# Altium PCB NB3000XN.PcbDoc (part 30 of 71)
Units mil, origin at the board's own origin, x right, y up, seen from the top; angles counter-clockwise.
Board outline 9527.56 x 6929.77 mil, 6 copper layers (Top Layer, GND+SHIELD, MidLayer1, MidLayer2, P2 - 3V3+5V0, Bottom Layer), stack 62.375 mil thick; 832 components, 1027 nets, 4655 pads, 4981 vias.
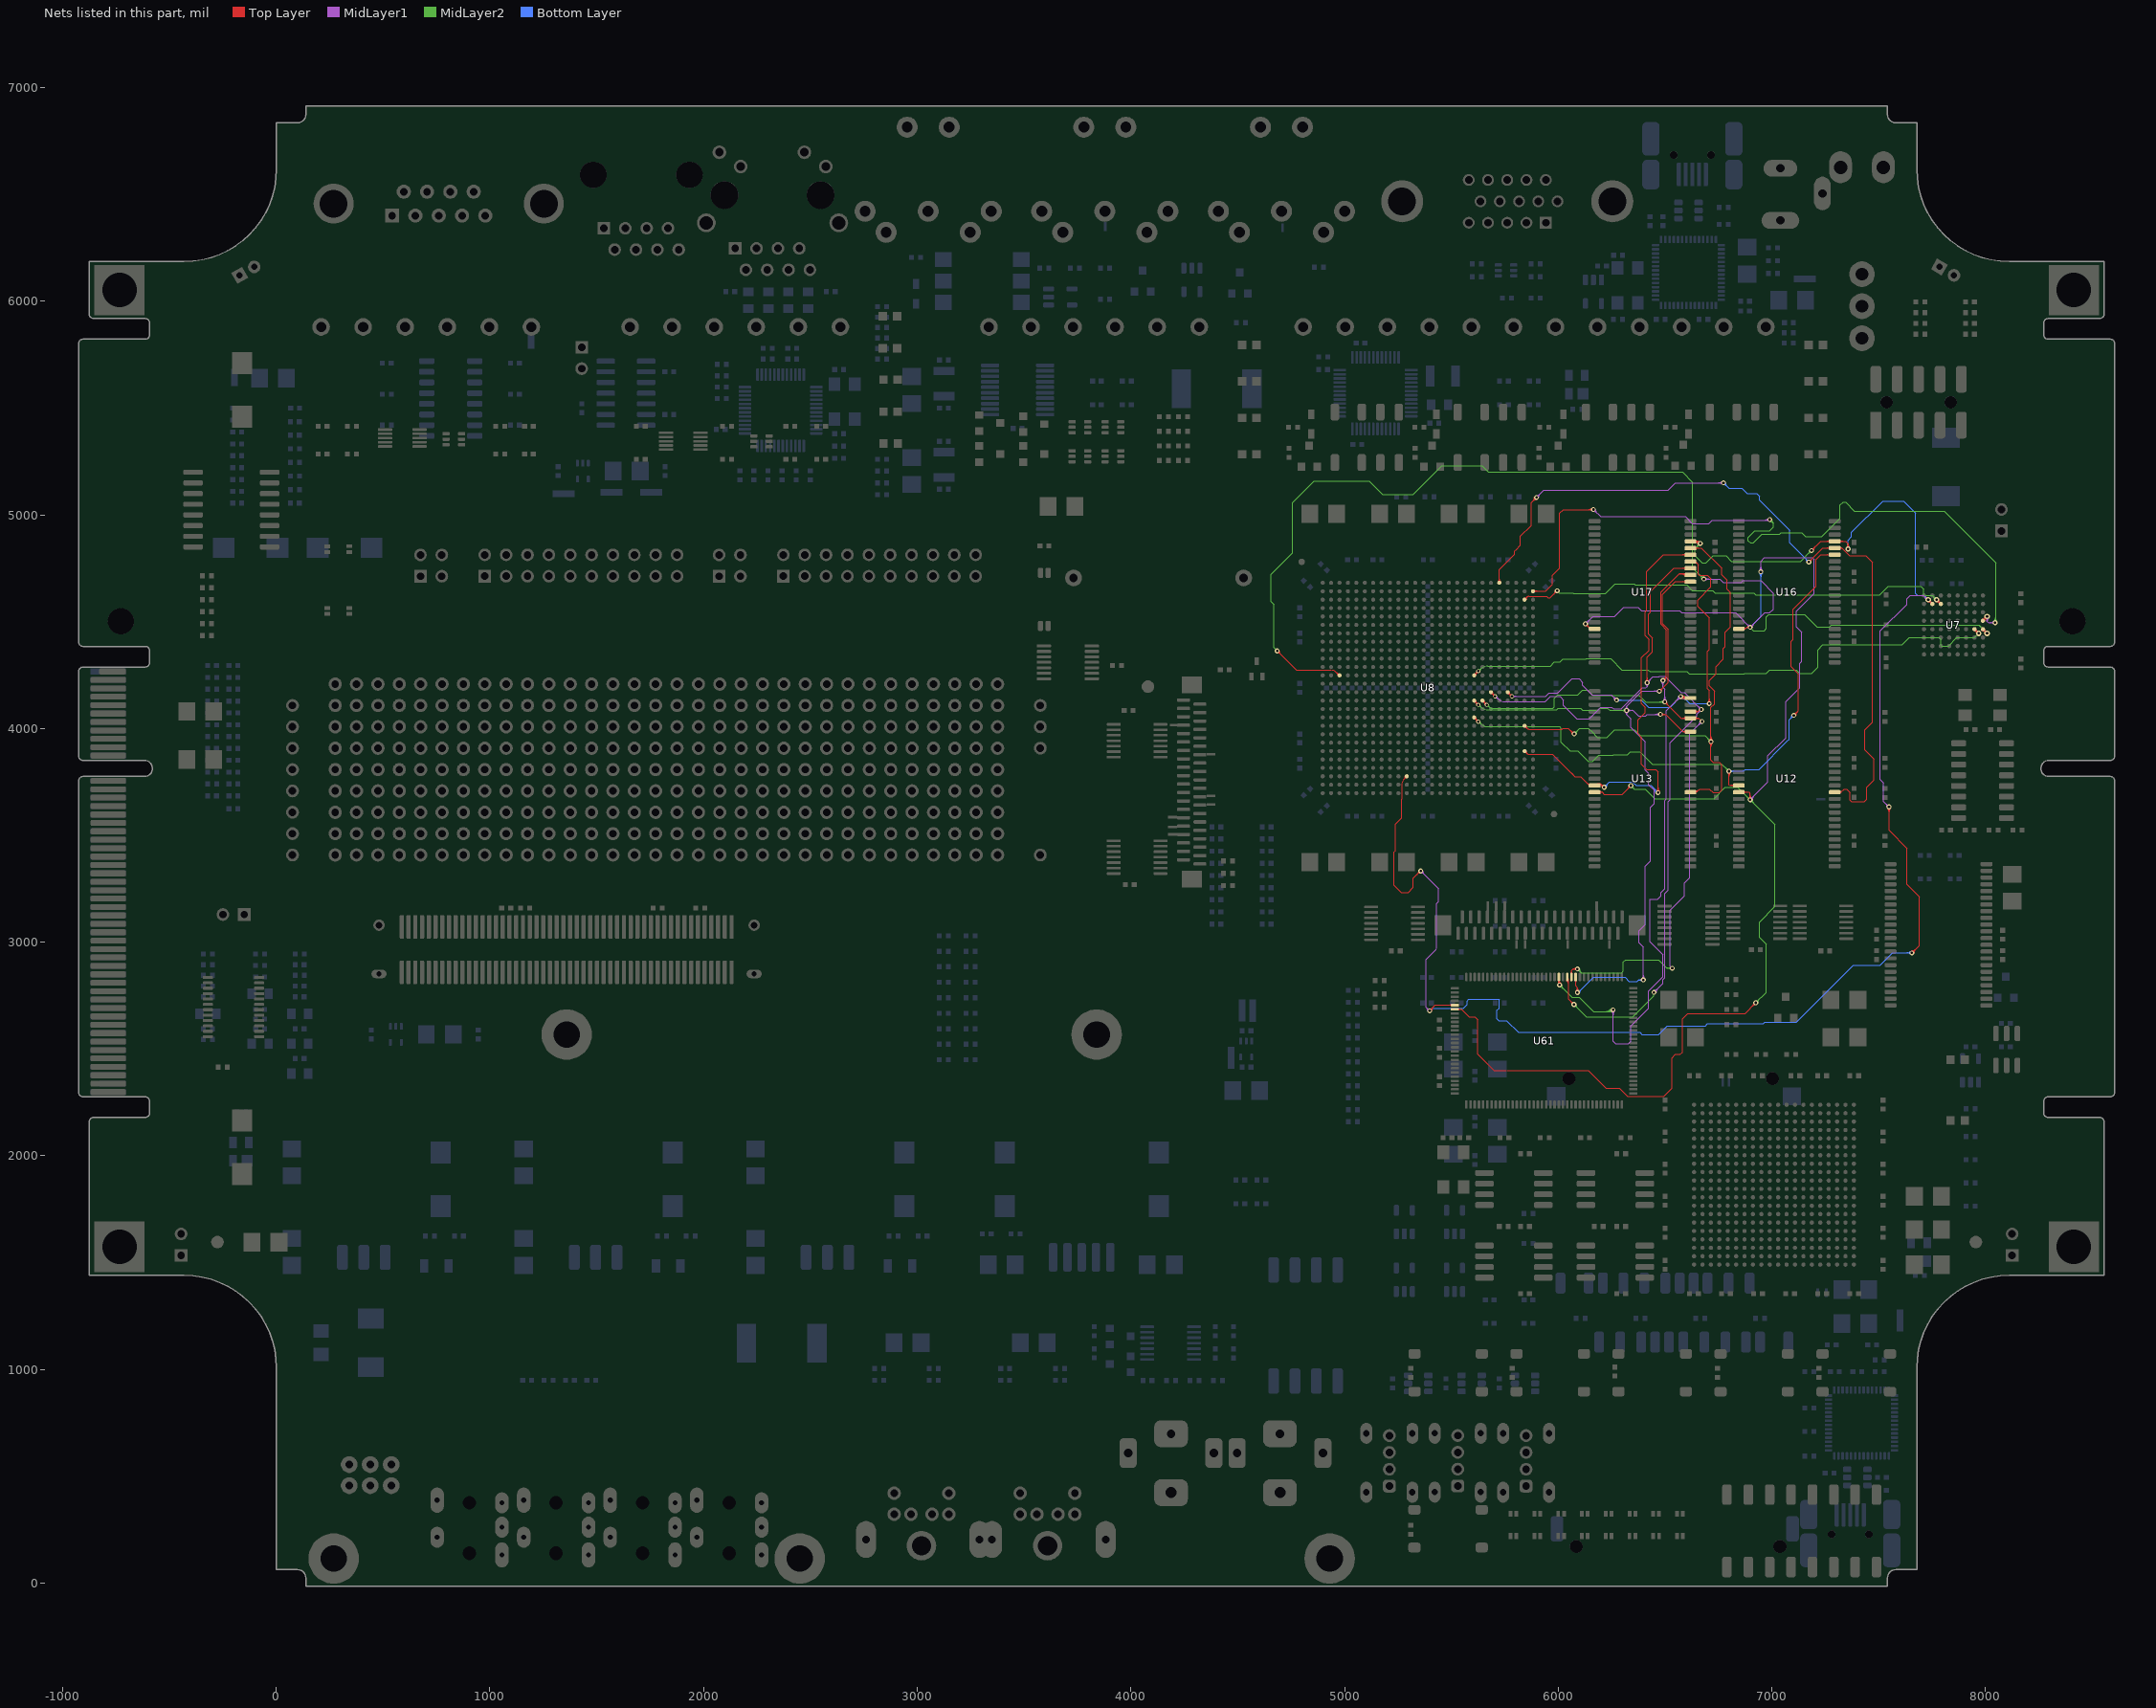
[diagram p34: the nets of this part, all layers, seen from the top]

## Via types
v1: diameter 23, hole 11.81, Top Layer to Bottom Layer, 3672 vias
v2: diameter 26, hole 11.81, Top Layer to Bottom Layer, 461 vias
v3: diameter 19, hole 11.81, Top Layer to Bottom Layer, tented both sides, 396 vias
v4: diameter 23.62, hole 11.81, Top Layer to Bottom Layer, 288 vias
v5: diameter 20, hole 11.81, Top Layer to Bottom Layer, 91 vias
v6: diameter 23, hole 11.81, Top Layer to Bottom Layer, tented both sides, 50 vias
v7: diameter 31, hole 11.81, Top Layer to Bottom Layer, 15 vias
v8: diameter 27.56, hole 11.81, Top Layer to Bottom Layer, tented both sides, 4 vias
v9: diameter 29, hole 11.81, Top Layer to Bottom Layer, 3 vias
v10: diameter 21, hole 11.81, Top Layer to Bottom Layer, 1 vias

## Nets (pads, with @x,y where several pads share a name; then routed paths per layer and width w, separated by ;. In a path a pad name is that pad's centre, name@x,y a point inside that pad or via, vN(x,y) a via of type N, cw(c..) or ccw(c..) an arc to the next point about the centre after c; other vN are vias at no path point) (continued)
DB_MEM.BUS_D28: U8.R19 U13.48 U17.35 U61.76 | length 4548
  Top Layer w4: U8.R19@5606.54,4123.44 cw(c5606.54,4105.34) 5619.34,4118.14 cw(c5632.14,4130.94) U8.R19@5614.04,4130.94 ; U8.R19@5606.54,4123.6 cw(c5606.54,4105.88) 5619.07,4118.41 cw(c5631.6,4130.94) U8.R19@5613.88,4130.94 ; U8.R19@5606.54,4130.94 v3(5626.22,4111.26) ; U61.76@6078.98,2821.32 cw(c6072.15,2814.49) 6081.81,2814.49 cw(c6091.47,2814.49) U61.76@6084.64,2821.32 ; U61.76@6081.81,2837.34 6081.81,2795 6090.19,2786.62 ; v1@6083.7,2771.64 ccw(c6069.67,2786.62) 6090.19,2786.62 ; v1@6086.43,2768.72 ccw(c6078.31,2777.39) 6090.19,2777.39 ccw(c6102.07,2777.39) v1@6093.95,2768.72 ; v1(6090.19,2764.71) 6090.19,2786.62 ; v1@6096.68,2771.64 cw(c6110.71,2786.62) 6090.19,2786.62 ; v1(6473.52,4175.04) 6515.19,4216.71 6515.19,4465.37 6488.86,4491.71 6488.86,4627.58 6548.52,4687.24 U17.35@6619.41,4687.24 ; v1@6473.52,4180.54 ccw(c6473.52,4193.82) 6482.91,4184.43 ccw(c6492.3,4175.04) v1@6479.02,4175.04 ; v1@6473.52,4184.54 ccw(c6473.52,4207.48) 6489.74,4191.26 ccw(c6505.96,4175.04) v1@6483.02,4175.04 ; v1(6478.52,4066.71) 6503.29,4066.71 6584.53,3985.47 ; v1@6482.41,4062.82 cw(c6491.8,4053.43) 6491.8,4066.71 cw(c6491.8,4079.99) v1@6482.41,4070.6 ; v1@6485.24,4059.99 cw(c6501.46,4043.77) 6501.46,4066.71 cw(c6501.46,4089.64) v1@6485.24,4073.43 ; U13.48@6595.76,3980.29 ccw(c6584.53,3970.72) 6584.53,3985.47 ; U13.48@6595.76,3990.66 cw(c6584.53,4000.23) 6584.53,3985.47 ; U17.35@6596.19,4681.59 ccw(c6582.54,4667.93) 6582.54,4687.24 ccw(c6582.54,4706.56) U17.35@6596.19,4692.9 ; U13.48@6619.41,3985.47 6584.53,3985.47 ; 5613.42,4124.06 cw(c5600.61,4111.26) 5618.72,4111.26 ccw(c5600.61,4111.26) 5613.42,4124.06 ; 5613.42,4124.06 ccw(c5626.22,4136.87) 5626.22,4118.76 cw(c5626.22,4136.87) 5613.42,4124.06
  MidLayer1 w4: v4@6314,4077.24 cw(c6304.52,4065) 6320,4065 ; v4@6314.24,4092.94 ccw(c6306.04,4104.24) 6320,4104.24 ; v4@6316.44,4080.4 cw(c6310.83,4073.15) 6320,4073.15 cw(c6329.17,4073.15) v4@6323.56,4080.4 ; v4@6324.11,4080.89 cw(c6334.03,4070.97) 6334.03,4085 cw(c6334.03,4099.03) v4@6324.11,4089.11 ; v4@6325.76,4092.94 cw(c6333.96,4104.24) 6320,4104.24 ; v4@6326,4077.24 ccw(c6335.48,4065) 6320,4065 ; v4@6326.94,4078.06 cw(c6343.69,4061.31) 6343.69,4085 cw(c6343.69,4108.69) v4@6326.94,4091.94 ; v1@6391.81,2830.09 ccw(c6375.59,2846.31) 6398.52,2846.31 ccw(c6421.46,2846.31) v1@6405.24,2830.09 ; v1@6394.64,2827.26 ccw(c6385.25,2836.65) 6398.52,2836.65 ccw(c6411.8,2836.65) v1@6402.41,2827.26 ; v1(6398.52,2823.37) 6398.52,2978.02 6379.19,2997.35 6379.19,3054.08 6406.86,3081.75 6406.86,3356.39 6431.86,3381.39 6431.86,3631.06 6449.19,3648.39 6449.19,3711.35 6423.52,3737.02 6423.52,3789.35 6406.86,3806.02 6406.86,3937.69 6340,4004.54 6340,4045 6320,4065 ; v1@6466.81,4168.32 ccw(c6450.59,4152.11) 6450.59,4175.04 ccw(c6450.59,4197.98) v1@6466.81,4181.76 ; v1@6469.64,4171.15 ccw(c6460.25,4161.76) 6460.25,4175.04 ccw(c6460.25,4188.32) v1@6469.64,4178.93 ; v1@6471.81,4059.99 ccw(c6455.59,4043.77) 6455.59,4066.71 ccw(c6455.59,4089.64) v1@6471.81,4073.43 ; v1(6473.52,4175.04) 6390.8,4175.04 6320,4104.24 ; v1@6474.64,4062.82 ccw(c6465.25,4053.43) 6465.25,4066.71 ccw(c6465.25,4079.99) v1@6474.64,4070.6 ; v1(6478.52,4066.71) 6416.71,4066.71 6410,4060 6375,4060 6350,4085 v4(6320,4085) ; 6320,4065 v4(6320,4085) ; v4(6320,4085) 6320,4104.24
  MidLayer2 w4: v3@5626.87,4103.79 cw(c5628.45,4085.75) 5640.09,4099.62 ; v3@5633.69,4111.91 ccw(c5651.73,4113.49) 5640.09,4099.62 ; v4@6313.06,4078.06 ccw(c6296.31,4061.31) 6296.31,4085 ccw(c6296.31,4108.69) v4@6313.06,4091.94 ; v4@6315.89,4080.89 ccw(c6305.97,4070.97) 6305.97,4085 ccw(c6305.97,4099.03) v4@6315.89,4089.11 ; v4(6320,4085) 6242.25,4085 6231.54,4095.71 6195.71,4095.71 6185,4085 6115,4085 6105,4095 6000,4095 5992.4,4087.4 5920,4087.4 5910,4087.4 5782.64,4087.4 5763.22,4087.4 5689.1,4087.4 5669.6,4087.4 cw(c5669.6,4129.13) 5640.09,4099.62
  Bottom Layer w4: v1(6090.19,2764.71) 6094.86,2764.71 6166.19,2836.04 6312.52,2836.04 6331.86,2816.71 6370,2816.71 6376.67,2823.37 ; v1@6090.19,2766.21 ccw(c6090.19,2781.1) 6100.72,2770.57 ; v1@6090.19,2770.21 ccw(c6090.19,2794.75) 6107.55,2777.4 ; v1@6090.19,2774.21 ccw(c6090.19,2808.41) 6114.37,2784.23 ; v1@6099.69,2764.71 cw(c6111.36,2764.71) 6103.11,2772.96 ; v1@6391.58,2816.89 ccw(c6376.67,2802.98) 6376.67,2823.37 ; v1@6391.58,2829.86 cw(c6376.67,2843.77) 6376.67,2823.37 ; v1@6394.5,2819.62 ccw(c6385.87,2811.57) 6385.87,2823.37 ccw(c6385.87,2835.18) v1@6394.5,2827.13 ; v1(6398.52,2823.37) 6376.67,2823.37
DB_MEM.BUS_D29: U8.R20 U13.50 U17.36 U61.77 | length 4450
  Top Layer w4: U8.R20@5645.91,4123.44 cw(c5645.91,4105.34) 5658.71,4118.14 cw(c5671.51,4130.94) U8.R20@5653.41,4130.94 ; U8.R20@5645.91,4123.6 cw(c5645.91,4105.88) 5658.44,4118.41 cw(c5670.97,4130.94) U8.R20@5653.25,4130.94 ; U8.R20@5645.91,4130.94 v3(5665.59,4111.26) ; U61.77@6059.3,2853.36 ccw(c6052.47,2860.19) 6062.13,2860.19 ccw(c6071.78,2860.19) U61.77@6064.95,2853.36 ; U61.77@6062.12,2837.34 6062.13,2867.04 6070.13,2875.04 ; v1@6082.84,2869.02 ccw(c6070.13,2858.6) 6070.13,2875.04 ; v1@6082.84,2881.06 cw(c6070.13,2891.48) 6070.13,2875.04 ; v1@6085.94,2871.56 ccw(c6078.57,2865.52) 6078.57,2875.04 ccw(c6078.57,2884.56) v1@6085.94,2878.53 ; v1(6090.19,2875.04) 6070.13,2875.04 ; v1(6490.19,4225.04) 6506.86,4241.71 6506.86,4462.39 6480.52,4488.73 6480.52,4639.37 6566.19,4725.04 6601.84,4725.04 6601.84,4718.74 U17.36@6619.41,4718.74 ; v1@6490.19,4230.54 ccw(c6490.19,4243.82) 6499.58,4234.43 ccw(c6508.97,4225.04) v1@6495.69,4225.04 ; v1@6490.19,4234.54 ccw(c6490.19,4257.48) 6506.41,4241.26 ccw(c6522.63,4225.04) v1@6499.69,4225.04 ; v1@6498.52,4115.54 cw(c6498.52,4092.61) 6514.74,4108.82 cw(c6530.96,4125.04) v1@6508.02,4125.04 ; v1@6498.52,4119.54 cw(c6498.52,4106.26) 6507.91,4115.65 cw(c6517.3,4125.04) v1@6504.02,4125.04 ; v1(6498.52,4125.04) 6575.1,4048.46 U13.50@6619.41,4048.46 6658.44,4048.46 v1(6673.52,4033.37) ; 6567.33,4725.04 cw(c6567.33,4684.21) U17.36@6596.19,4713.08 ; 6576.98,4725.04 cw(c6576.98,4693.87) U17.36@6599.02,4715.91 ; 6586.64,4725.04 cw(c6586.64,4703.53) U17.36@6601.85,4718.74 ; U13.50@6596.19,4042.81 ccw(c6582.54,4029.15) 6582.54,4048.46 ccw(c6582.54,4067.78) U13.50@6596.19,4054.12 ; U13.50@6642.63,4042.81 cw(c6656.28,4029.15) 6656.28,4048.46 cw(c6656.28,4067.78) U13.50@6642.63,4054.12 ; 5652.79,4124.06 cw(c5639.98,4111.26) 5658.09,4111.26 ccw(c5639.98,4111.26) 5652.79,4124.06 ; 5652.79,4124.06 ccw(c5665.59,4136.87) 5665.59,4118.76 cw(c5665.59,4136.87) 5652.79,4124.06
  MidLayer1 w4: v1@6483.47,4218.32 cw(c6467.26,4202.11) 6490.19,4202.11 cw(c6513.13,4202.11) v1@6496.91,4218.32 ; v1@6486.3,4221.15 cw(c6476.91,4211.76) 6490.19,4211.76 cw(c6503.47,4211.76) v1@6494.08,4221.15 ; v1(6490.19,4225.04) 6490.19,4193.33 6498.52,4185 v1(6498.52,4125.04) ; v1@6491.81,4131.76 ccw(c6475.59,4147.98) 6498.52,4147.98 ccw(c6521.46,4147.98) v1@6505.24,4131.76 ; v1@6494.64,4128.93 ccw(c6485.25,4138.32) 6498.52,4138.32 ccw(c6511.8,4138.32) v1@6502.41,4128.93 ; v1(6533.86,2878.37) 6523.52,2888.71 6523.52,3150.04 6590.19,3216.71 6590.19,3277.04 6615.19,3302.04 6615.19,3975.04 v1(6673.52,4033.37) ; v1@6664.02,4033.37 cw(c6641.09,4033.37) 6657.31,4017.16 cw(c6673.52,4000.94) v1@6673.52,4023.87 ; v1@6668.02,4033.37 cw(c6654.75,4033.37) 6664.14,4023.99 cw(c6673.52,4014.6) v1@6673.52,4027.87
  MidLayer2 w4: v3@5666.24,4103.79 cw(c5667.82,4085.75) 5679.46,4099.62 cw(c5691.1,4113.49) v3@5673.06,4111.91 ; 5679.17,4099.87 ccw(c5689.1,4109.8) 5689.1,4095.75 5782.64,4095.75 5910,4095.75 5920,4095.75 5975.75,4095.75 5981.86,4101.86 5981.86,4141.71 5998.52,4158.37 6092.54,4158.37 6114.17,4180 6139.56,4180 6163.19,4156.37 6320,4156.37 6378.54,4156.37 6409.88,4125.04 v1(6498.52,4125.04) ; v1@6090.19,2865.54 cw(c6090.19,2842.61) 6106.41,2858.82 cw(c6122.63,2875.04) v1@6099.69,2875.04 ; v1@6090.19,2869.54 cw(c6090.19,2856.26) 6099.58,2865.65 cw(c6108.97,2875.04) v1@6095.69,2875.04 ; v1@6090.23,2875 v1(6090.19,2875.04) 6107.86,2857.37 6297,2857.37 6305,2865.37 6305,2907.71 6315,2917.71 6470,2917.71 6509.33,2878.37 v1(6533.86,2878.37) ; v1@6491.81,4118.32 ccw(c6475.59,4102.11) 6475.59,4125.04 ccw(c6475.59,4147.98) v1@6491.81,4131.76 ; v1@6494.64,4121.15 ccw(c6485.25,4111.76) 6485.25,4125.04 ccw(c6485.25,4138.32) v1@6494.64,4128.93 ; v1@6527.14,2871.66 ccw(c6510.92,2855.44) 6510.92,2878.37 ccw(c6510.92,2901.31) v1@6527.14,2885.09 ; v1@6529.97,2874.49 ccw(c6520.58,2865.1) 6520.58,2878.37 ccw(c6520.58,2891.65) v1@6529.97,2882.26
DB_MEM.BUS_D30: U8.P21 U13.51 U17.37 U61.78 | length 4758.4
  Top Layer w4: U8.P21@5685.28,4162.81 cw(c5685.28,4144.71) 5698.08,4157.51 cw(c5710.88,4170.31) U8.P21@5692.78,4170.31 ; U8.P21@5685.28,4162.97 cw(c5685.28,4145.25) 5697.81,4157.78 cw(c5710.34,4170.31) U8.P21@5692.62,4170.31 ; U8.P21@5685.28,4170.31 v3(5704.96,4150.63) ; U61.78@6039.61,2821.32 cw(c6018.09,2799.8) 6048.52,2799.8 ; U61.78@6042.44,2824.14 cw(c6027.75,2809.46) 6048.52,2809.46 ; U61.78@6045.27,2826.97 cw(c6037.41,2819.11) 6048.52,2819.11 ; U61.78@6048.1,2829.8 cw(c6047.07,2828.77) 6048.52,2828.77 ; 6048.52,2827.29 6048.52,2733.37 v1(6073.52,2708.37) ; v1@6064.02,2708.37 ccw(c6041.09,2708.37) 6057.31,2724.59 ccw(c6073.52,2740.81) v1@6073.52,2717.87 ; v1@6068.02,2708.37 ccw(c6054.75,2708.37) 6064.14,2717.76 ccw(c6073.52,2727.15) v1@6073.52,2713.87 ; v1(6416.19,4214.37) 6416.19,4334.69 6441.52,4360.02 6441.52,4423.71 6423.52,4441.71 6423.52,4536.37 6431.86,4544.71 6431.86,4640.71 6541.19,4750.04 6619.41,4750.04 6623.52,4750.04 6623.52,4750.24 U17.37@6619.41,4750.24 ; 6582.07,4750.04 ccw(c6582.07,4770.02) U17.37@6596.19,4755.89 ; 6583.01,4750.04 cw(c6583.01,4731.39) U17.37@6596.19,4744.58 ; 6591.72,4750.04 ccw(c6591.72,4760.36) U17.37@6599.02,4753.06 ; U13.51@6619.41,4079.96 6653.44,4079.96 ; U13.51@6643.26,4075.01 cw(c6653.44,4067) 6653.44,4079.96 ; U13.51@6643.26,4084.91 ccw(c6653.44,4092.92) 6653.44,4079.96 ; 6654.1,4080.62 cw(c6663.8,4070.92) v1@6668.36,4083.85 ; 6658.59,4085.11 cw(c6666.14,4077.56) v1@6669.69,4087.63 ; v1(6670.19,4089.04) 6662.52,4089.04 6653.44,4079.96 ; 5692.16,4163.43 cw(c5679.35,4150.63) 5697.46,4150.63 ccw(c5679.35,4150.63) 5692.16,4163.43 ; 5692.16,4163.43 ccw(c5704.96,4176.24) 5704.96,4158.13 cw(c5704.96,4176.24) 5692.16,4163.43 ; 6416.19,4227.65 cw(c6402.91,4227.65) 6412.3,4218.26 ccw(c6402.91,4227.65) 6416.19,4227.65 ; 6416.19,4227.65 ccw(c6429.47,4227.65) 6420.08,4218.26 cw(c6429.47,4227.65) 6416.19,4227.65 ; 6416.19,4237.31 cw(c6393.26,4237.31) 6409.47,4221.09 ccw(c6393.26,4237.31) 6416.19,4237.31 ; 6416.19,4237.31 ccw(c6439.13,4237.31) 6422.91,4221.09 cw(c6439.13,4237.31) 6416.19,4237.31
  MidLayer1 w4: v3@5705.61,4143.16 cw(c5707.19,4125.12) 5718.83,4138.99 ; v3@5712.43,4151.28 ccw(c5730.47,4152.86) 5718.83,4138.99 ; 5781.77,4126.77 5767.84,4126.77 ; v1@6416.19,4219.87 ccw(c6416.19,4233.15) 6425.58,4223.76 ccw(c6434.97,4214.37) v1@6421.69,4214.37 ; v1@6416.19,4223.87 ccw(c6416.19,4246.81) 6432.41,4230.59 ccw(c6448.63,4214.37) v1@6425.69,4214.37 ; v1(6448.52,2765.37) 6490.19,2807.04 6490.19,2825.65 6499.19,2834.65 6499.19,3227.73 6515.19,3243.73 6515.19,3657.77 6523.52,3666.1 6523.52,3933.34 6650,4059.81 6650,4068.85 v1(6670.19,4089.04) 6591.52,4167.71 6575.86,4167.71 6498.52,4245.04 6475,4245.04 6472,4242.04 6443.86,4242.04 v1(6416.19,4214.37) 6416.19,4196.04 ; v1@6448.52,2770.87 ccw(c6448.52,2784.15) 6457.91,2774.76 ccw(c6467.3,2765.37) v1@6454.02,2765.37 ; v1@6448.52,2774.87 ccw(c6448.52,2797.81) 6464.74,2781.59 ccw(c6480.96,2765.37) v1@6458.02,2765.37 ; v1@6670.19,4079.54 ccw(c6670.19,4056.61) 6653.97,4072.82 ccw(c6637.76,4089.04) 6660.69,4089.04 ccw(c6637.76,4089.04) 6653.97,4105.26 ccw(c6670.19,4121.48) v1@6670.19,4098.54 ; v1@6670.19,4083.54 ccw(c6670.19,4070.26) 6660.8,4079.65 ccw(c6651.41,4089.04) 6664.69,4089.04 ccw(c6651.41,4089.04) 6660.8,4098.43 ccw(c6670.19,4107.82) v1@6670.19,4094.54 ; 5718.83,4138.99 ccw(c5748.34,4168.5) 5748.34,4126.77 5767.84,4126.77 ; 5767.84,4126.77 5841.96,4126.77 5861.38,4126.77 5910,4126.77 5920,4126.77 5924.74,4126.77 5940.25,4126.77 5963.52,4150.04 6008.52,4150.04 6025.52,4133.04 6025.52,4108.04 6087.69,4045.87 6144.36,4045.87 6198.52,4100.04 6250.9,4100.04 6259.23,4091.71 6296.15,4091.71 6394.62,4190.18 6410.33,4190.18 6416.19,4196.04 ; 6416.19,4196.04 cw(c6429.13,4196.04) 6421.67,4206.61 ccw(c6429.13,4196.04) 6416.19,4196.04 ; 6416.19,4196.04 ccw(c6403.25,4196.04) 6410.71,4206.61 cw(c6403.25,4196.04) 6416.19,4196.04
  MidLayer2 w4: v1@6073.52,2698.87 cw(c6073.52,2675.94) 6089.74,2692.16 cw(c6105.96,2708.37) v1@6083.02,2708.37 ; v1@6073.52,2702.87 cw(c6073.52,2689.6) 6082.91,2698.99 cw(c6092.3,2708.37) v1@6079.02,2708.37 ; v1(6073.52,2708.37) 6131.86,2650.04 6348.52,2650.04 6448.52,2750.04 v1(6448.52,2765.37)
DB_MEM.BUS_D31: U8.P23 U13.53 U17.38 U61.80 | length 5350.7
  Top Layer w4: U8.P23@5764.02,4162.81 cw(c5764.02,4144.71) 5776.82,4157.51 cw(c5789.62,4170.31) U8.P23@5771.52,4170.31 ; U8.P23@5764.02,4162.97 cw(c5764.02,4145.25) 5776.55,4157.78 cw(c5789.08,4170.31) U8.P23@5771.36,4170.31 ; U8.P23@5764.02,4170.31 v3(5783.7,4150.63) ; v1@6000.14,2806.43 ccw(c5993.06,2813.5) 6003.07,2813.5 ; U61.80@6000.24,2821.32 cw(c5993.41,2814.49) 6003.07,2814.49 cw(c6012.73,2814.49) U61.80@6005.9,2821.32 ; 6003.07,2812.47 ccw(c6019.62,2812.47) v1@6007.92,2800.77 ; U61.80@6003.07,2822.13 ccw(c6029.28,2822.13) v1@6010.75,2803.6 ; U61.80@6003.07,2831.79 ccw(c6038.93,2831.79) v1@6013.57,2806.43 ; U61.80@6003.07,2837.34 6003.07,2810.83 6006.86,2807.04 v1(6006.86,2799.71) ; v1@6571.76,4148.27 ccw(c6584.6,4161.12) 6584.6,4142.95 ; v1(6573.52,4150.04) 6573.52,4143.37 6575.19,4141.71 6581.86,4141.71 6583.1,4142.95 ; v1@6574.58,4151.1 ccw(c6594.26,4170.77) U13.53@6594.26,4142.95 ; v1@6577.41,4153.93 ccw(c6603.91,4180.43) U13.53@6603.91,4142.95 ; v1@6580.24,4156.76 ccw(c6613.57,4190.09) U13.53@6613.57,4142.95 ; U13.53@6596.07,4137.42 ccw(c6583.1,4124.99) 6583.1,4142.95 ; U13.53@6596.07,4148.49 cw(c6583.1,4160.92) 6583.1,4142.95 ; U13.53@6619.41,4142.95 6583.1,4142.95 ; U17.38@6619.41,4781.73 6631.86,4781.73 6631.86,4775.04 6648.52,4775.04 6656.86,4766.71 6656.86,4722.37 6661.52,4717.71 6698.52,4717.71 6715.19,4701.04 6715.19,4662.71 6653.86,4601.37 6653.86,4570.96 6706.86,4517.96 6706.86,4369.35 6698.52,4361.02 6698.52,4185.71 6706.86,4177.37 v1(6706.86,4116.71) ; U17.38@6636.97,4777.73 cw(c6636.97,4756.33) 6652.1,4771.46 ; U17.38@6640.35,4774.48 cw(c6644.31,4765.97) 6650.96,4772.61 ; v1@6700.14,4123.43 ccw(c6683.92,4139.64) 6706.86,4139.64 ccw(c6729.79,4139.64) v1@6713.57,4123.43 ; v1@6702.97,4120.6 ccw(c6693.58,4129.99) 6706.86,4129.99 ccw(c6720.14,4129.99) v1@6710.75,4120.6 ; 5770.9,4163.43 cw(c5758.09,4150.63) 5776.2,4150.63 ccw(c5758.09,4150.63) 5770.9,4163.43 ; 5770.9,4163.43 ccw(c5783.7,4176.24) 5783.7,4158.13 cw(c5783.7,4176.24) 5770.9,4163.43 ; U17.38@6644.97,4781.73 ccw(c6652.54,4781.73) 6647.19,4776.38 cw(c6652.54,4781.73) U17.38@6644.97,4781.73
  MidLayer1 w4: v3(5783.7,4150.63) 5861.38,4150.63 5910,4150.63 5920,4150.63 5941.05,4150.63 5957.13,4166.71 5998.52,4166.71 6065.19,4233.37 6098.52,4233.37 6115.19,4216.71 6115.19,4201.37 6158.19,4158.37 6248.52,4158.37 v1(6273.52,4133.37) ; v3@5788.89,4145.44 cw(c5801.43,4132.9) 5801.43,4150.63 cw(c5801.43,4168.36) v3@5788.89,4155.82 ; v1@6250.14,2676.66 cw(c6233.92,2660.44) 6256.86,2660.44 cw(c6279.79,2660.44) v1@6263.57,2676.66 ; v1@6252.97,2679.49 cw(c6243.58,2670.1) 6256.86,2670.1 cw(c6270.14,2670.1) v1@6260.75,2679.49 ; v1(6256.86,2683.37) 6256.86,2535.69 6267.51,2525.04 6328.88,2525.04 6340.19,2536.35 6340.19,2608.37 6423.52,2691.71 6423.52,2770.3 6491.19,2837.96 6491.19,2940.71 6430.86,3001.04 6430.86,3200.37 6431.86,3201.37 6465.19,3201.37 6481.86,3218.04 6481.86,3233.02 6498.52,3249.69 6498.52,3663.73 6506.86,3672.06 6506.86,4083.37 v1(6573.52,4150.04) ; v1@6264.02,4133.37 ccw(c6241.09,4133.37) 6257.31,4149.59 ccw(c6273.52,4165.81) v1@6273.52,4142.87 ; v1@6268.02,4133.37 ccw(c6254.75,4133.37) 6264.14,4142.76 ccw(c6273.52,4152.15) v1@6273.52,4138.87 ; v1@6564.02,4150.04 cw(c6541.09,4150.04) 6557.31,4133.82 cw(c6573.52,4117.61) v1@6573.52,4140.54 ; v1@6568.02,4150.04 cw(c6554.75,4150.04) 6564.14,4140.65 cw(c6573.52,4131.26) v1@6573.52,4144.54 ; 5801.81,4150.63 cw(c5801.81,4168.74) 5789,4155.93 ccw(c5801.81,4168.74) 5801.81,4150.63 ; 5801.81,4150.63 ccw(c5801.81,4132.52) 5789,4145.33 cw(c5801.81,4132.52) 5801.81,4150.63
  MidLayer2 w4: v1@6006.86,2790.21 cw(c6006.86,2767.27) 6023.07,2783.49 cw(c6039.29,2799.71) v1@6016.36,2799.71 ; v1@6006.86,2794.21 cw(c6006.86,2780.93) 6016.25,2790.32 cw(c6025.64,2799.71) v1@6012.36,2799.71 ; v1(6006.86,2799.71) 6064.86,2741.71 6099.52,2741.71 6166.19,2675.04 6248.52,2675.04 v1(6256.86,2683.37) ; 6213.8,2675.04 ccw(c6213.8,2726.43) v1@6250.14,2690.09 ; 6223.46,2675.04 ccw(c6223.46,2716.77) v1@6252.97,2687.26 ; 6233.12,2675.04 ccw(c6233.12,2707.12) v1@6255.8,2684.44 ; 6242.77,2675.04 ccw(c6242.77,2697.46) v1@6258.62,2681.61
  Bottom Layer w4: v1(6273.52,4133.37) 6390.19,4133.37 6423.52,4100.04 6523.52,4100.04 v1(6573.52,4150.04) 6582.52,4150.04 6615.86,4116.71 v1(6706.86,4116.71) ; v1@6277.41,4129.49 cw(c6286.8,4120.1) 6286.8,4133.37 cw(c6286.8,4146.65) v1@6277.41,4137.26 ; v1@6280.24,4126.66 cw(c6296.46,4110.44) 6296.46,4133.37 cw(c6296.46,4156.31) v1@6280.24,4140.09 ; v1@6564.02,4150.04 cw(c6541.09,4150.04) 6557.31,4133.82 cw(c6573.52,4117.61) 6573.52,4140.54 cw(c6573.52,4095.88) 6605.11,4127.46 ; v1@6568.02,4150.04 cw(c6554.75,4150.04) 6564.14,4140.65 cw(c6573.52,4131.26) 6573.52,4144.54 cw(c6573.52,4109.53) 6598.28,4134.29 ; v1@6573.52,4148.54 cw(c6573.52,4123.19) 6591.45,4141.12
DB_MEM.BUS_FLASH_NBUSY: U7.A4 U8.B26 | length 3978.1
  Top Layer w4: U8.B26@5882.13,4642.76 5910,4642.76 5920,4642.76 5924.74,4642.76 5941.24,4642.76 5973.52,4675.04 5973.52,4716.71 6006.86,4750.04 6006.86,5008.37 6023.52,5025.04 v1(6165.19,5025.04) ; U8.B26@5887.32,4637.56 cw(c5899.85,4625.03) 5899.85,4642.76 cw(c5899.85,4660.48) U8.B26@5887.32,4647.95 ; U8.B26@5887.43,4637.45 cw(c5900.23,4624.65) 5900.23,4642.76 cw(c5900.23,4660.86) U8.B26@5887.43,4648.06 ; v1@6158.47,5018.32 ccw(c6142.26,5002.11) 6142.26,5025.04 ccw(c6142.26,5047.98) v1@6158.47,5031.76 ; v1@6161.3,5021.15 ccw(c6151.91,5011.76) 6151.91,5025.04 ccw(c6151.91,5038.32) v1@6161.3,5028.93
  Top Layer w8: U7.A4@7987.8,4504.68 v2(8007.48,4524.37) ; U7.A4@7987.8,4510.68 ccw(c7987.8,4525.17) 7998.04,4514.93 ccw(c8008.28,4504.68) U7.A4@7993.8,4504.68 ; v2@7998.48,4524.37 cw(c7976.75,4524.37) 7992.12,4509.01 cw(c8007.48,4493.64) v2@8007.48,4515.37
  MidLayer1 w4: v1@6165.19,5015.54 cw(c6165.19,4992.61) 6181.41,5008.82 cw(c6197.63,5025.04) v1@6174.69,5025.04 ; v1@6165.19,5019.54 cw(c6165.19,5006.26) 6174.58,5015.65 cw(c6183.97,5025.04) v1@6170.69,5025.04 ; v1(6165.19,5025.04) 6198.52,4991.71 6595,4991.71 6626.71,4960 6704.96,4960 6720,4975.04 6988.52,4975.04 6990.19,4976.71 v1(6990.19,4978.04) ; 6960.01,4975.04 ccw(c6960.01,5008.22) v1@6983.47,4984.76 ; 6969.67,4975.04 ccw(c6969.67,4998.56) v1@6986.3,4981.93 ; 6974.5,4975.04 cw(c6974.5,4962.35) v1@6983.47,4971.32 ; v2@8000.93,4515.53 cw(c7991.28,4502.52) 8007.48,4502.52 ; v2@8003.31,4518.75 cw(c7997.17,4510.47) 8007.48,4510.47 cw(c8017.79,4510.47) v2@8011.65,4518.75 ; v2@8007.48,4525.04 8006.86,4525.04 8006.86,4524.37 v2(8007.48,4524.37) 8007.48,4502.52 ; v2@8014.03,4515.53 ccw(c8023.68,4502.52) 8007.48,4502.52 ; v1@8038.14,4488.66 ccw(c8021.92,4472.44) 8021.92,4495.37 ccw(c8021.92,4518.31) v1@8038.14,4502.09 ; v1@8040.97,4491.49 ccw(c8031.58,4482.1) 8031.58,4495.37 ccw(c8031.58,4508.65) v1@8040.97,4499.26 ; v1(8044.86,4495.37) 8014.63,4495.37 8007.48,4502.52
  MidLayer2 w4: v1@6990.19,4968.54 cw(c6990.19,4945.61) 7006.41,4961.82 cw(c7022.63,4978.04) v1@6999.69,4978.04 ; v1@6990.19,4972.54 cw(c6990.19,4959.26) 6999.58,4968.65 cw(c7008.97,4978.04) v1@6995.69,4978.04 ; v1(6990.19,4978.04) 7007.69,4960.54 7007.69,4942.79 6989.94,4925.04 6920.44,4925.04 6889.36,4893.96 6889.36,4879.46 6899.61,4869.21 6914.11,4869.21 6953.94,4909.04 7035.84,4909.04 7043.34,4916.54 7140.61,4916.54 7157.94,4899.21 7234.21,4899.21 7319.36,4984.36 7319.36,5045.62 7333.73,5060 7345,5060 7387,5018 7806.17,5018 8048.52,4775.65 8048.52,4491.71 v1(8044.86,4495.37) ; v1@8038.14,4502.09 ccw(c8013.07,4527.16) 8048.52,4527.16 ; v1@8040.97,4499.26 ccw(c8022.73,4517.51) 8048.52,4517.51 ; v1@8043.8,4496.44 ccw(c8032.38,4507.85) 8048.52,4507.85 ; 8048.52,4509.46 ccw(c8058.94,4509.46) v1@8051.57,4502.09
DB_MEM.BUS_FLASH_NCS: U7.F2 U8.C25 | length 2309.8
  Top Layer w4: v1@5985.69,4645.04 cw(c5962.76,4645.04) 5978.97,4628.82 cw(c5995.19,4612.61) v1@5995.19,4635.54 ; v1@5989.69,4645.04 cw(c5976.41,4645.04) 5985.8,4635.65 cw(c5995.19,4626.26) v1@5995.19,4639.54 ; v1(5995.19,4645.04) 5962.39,4612.24 5953,4612.24 5946.35,4618.89 5938.74,4618.89 5938,4618.89 5924.74,4618.89 5920,4618.89 5910,4618.89 5862.47,4618.89 ; 5855.29,4615.92 cw(c5862.47,4608.74) 5862.47,4618.89 ; 5855.29,4615.92 cw(c5862.47,4608.74) 5862.47,4618.89 ; 5855.29,4615.92 ccw(c5867.83,4603.39) 5850.1,4603.39 cw(c5867.83,4603.39) 5855.29,4615.92 ; 5855.29,4615.92 cw(c5842.76,4628.45) 5842.76,4610.73 ccw(c5842.76,4628.45) 5855.29,4615.92
  Top Layer w8: v2@7771.26,4594.11 cw(c7771.26,4572.38) 7786.62,4587.75 cw(c7801.99,4603.11) v2@7780.26,4603.11 ; v2(7771.26,4603.11) U7.F2@7790.95,4583.43 ; U7.F2@7784.95,4583.43 ccw(c7770.46,4583.43) 7780.7,4593.67 ccw(c7790.95,4603.91) U7.F2@7790.95,4589.43
  MidLayer2 w4: v1(5995.19,4645.04) 6005.19,4635.04 6069.52,4635.04 6072.52,4632.04 6222.19,4632.04 6266.19,4676.04 6356.86,4676.04 6361.19,4671.71 6601.86,4671.71 6627.86,4645.71 6723.52,4645.71 6734.52,4634.71 6915.19,4634.71 6924.19,4625.71 7504.54,4625.71 7545.54,4666.71 7697.52,4666.71 7711.52,4652.71 7711.52,4626.37 7715.52,4622.37 7752,4622.37 v2(7771.26,4603.11) ; v2@7760.26,4603.11 ccw(c7733.71,4603.11) 7752.48,4621.89 ccw(c7771.26,4640.67) v2@7771.26,4614.11 ; v2@7764.26,4603.11 ccw(c7747.36,4603.11) 7759.31,4615.06 ccw(c7771.26,4627.01) v2@7771.26,4610.11
DB_MEM.BUS_FLASH_NRESET: U7.B5 U8.M19 | length 2817.2
  Top Layer w4: U8.M19@5606.54,4249.06 v3(5626.22,4268.74) ; U8.M19@5606.54,4256.4 ccw(c5606.54,4274.12) 5619.07,4261.59 ccw(c5631.6,4249.06) U8.M19@5613.88,4249.06 ; U8.M19@5606.54,4256.56 ccw(c5606.54,4274.66) 5619.34,4261.86 ccw(c5632.14,4249.06) U8.M19@5614.04,4249.06 ; 5613.42,4255.94 cw(c5626.22,4243.13) 5626.22,4261.24 ccw(c5626.22,4243.13) 5613.42,4255.94 ; 5613.42,4255.94 ccw(c5600.61,4268.74) 5618.72,4268.74 cw(c5600.61,4268.74) 5613.42,4255.94
  Top Layer w8: U7.B5@7948.43,4459.32 cw(c7948.43,4444.83) 7958.67,4455.07 cw(c7968.91,4465.32) U7.B5@7954.43,4465.32 ; U7.B5@7948.43,4465.32 v2(7968.11,4445.63) ; v2@7959.11,4445.63 ccw(c7937.38,4445.63) 7952.75,4460.99 ccw(c7968.11,4476.36) v2@7968.11,4454.63
  MidLayer2 w4: v3@5626.87,4276.21 ccw(c5628.45,4294.25) 5640.09,4280.38 ; v3@5633.69,4268.09 cw(c5651.73,4266.51) 5640.09,4280.38 ; v2(7968.11,4445.63) 7948.52,4426.04 7865.86,4426.04 7826.86,4387.04 7793.52,4387.04 7790.52,4390.04 7790.52,4417.71 7781.86,4426.37 7643.86,4426.37 7609.19,4391.71 7237.86,4391.71 7215.19,4369.04 7215.19,4287.04 7186.52,4258.37 7131.86,4258.37 7115.19,4275.04 6990.19,4275.04 6973.86,4258.71 6873.52,4258.71 6871.86,4257.04 6612.51,4257.04 6602.84,4266.71 6428.88,4266.71 6420.54,4275.04 6298.52,4275.04 6246.86,4326.71 6131.86,4326.71 6129.86,4324.71 6021.52,4324.71 6009.19,4312.37 5982.88,4312.37 5963.1,4292.6 5920,4292.6 5910,4292.6 5782.64,4292.6 5763.22,4292.6 5689.1,4292.6 5669.6,4292.6 ccw(c5669.6,4250.87) 5640.09,4280.38
DB_MEM.BUS_NBE0: U8.U19 U12.15 U16.39 | length 3312.4
  Top Layer w4: U8.U19@5606.54,4044.7 cw(c5606.54,4026.6) 5619.34,4039.4 cw(c5632.14,4052.2) U8.U19@5614.04,4052.2 ; U8.U19@5606.54,4044.86 cw(c5606.54,4027.14) 5619.07,4039.67 cw(c5631.6,4052.2) U8.U19@5613.88,4052.2 ; U8.U19@5606.54,4052.2 v3(5626.22,4032.52) ; v1@6792.81,3793.66 cw(c6776.59,3777.44) 6799.52,3777.44 cw(c6822.46,3777.44) v1@6806.24,3793.66 ; v1@6795.64,3796.49 cw(c6786.25,3787.1) 6799.52,3787.1 cw(c6812.8,3787.1) v1@6803.41,3796.49 ; v1(6799.52,3800.37) 6799.52,3736.97 6802.99,3733.5 U12.15@6845.59,3733.5 ; U12.15@6822.37,3727.85 ccw(c6808.72,3714.19) 6808.72,3733.5 ccw(c6808.72,3752.82) U12.15@6822.37,3739.16 ; v1(7102.52,4061.71) 7123.52,4082.71 7123.52,4256.37 7090.19,4289.71 7090.19,4408.37 7098.52,4416.71 7098.52,4558.37 7206.86,4666.71 7206.86,4791.71 7228.38,4813.23 U16.39@7294.41,4813.23 ; v1@7102.52,4067.21 ccw(c7102.52,4080.49) 7111.91,4071.1 ccw(c7121.3,4061.71) v1@7108.02,4061.71 ; v1@7102.52,4071.21 ccw(c7102.52,4094.14) 7118.74,4077.93 ccw(c7134.96,4061.71) v1@7112.02,4061.71 ; U16.39@7271.19,4807.57 ccw(c7257.54,4793.91) 7257.54,4813.23 ccw(c7257.54,4832.54) U16.39@7271.19,4818.88 ; 5613.42,4045.32 cw(c5600.61,4032.52) 5618.72,4032.52 ccw(c5600.61,4032.52) 5613.42,4045.32 ; 5613.42,4045.32 ccw(c5626.22,4058.13) 5626.22,4040.02 cw(c5626.22,4058.13) 5613.42,4045.32
  MidLayer2 w4: v3@5626.87,4025.05 cw(c5628.45,4007.01) 5640.09,4020.88 ; v3@5633.69,4033.17 ccw(c5651.73,4034.75) 5640.09,4020.88 ; v1@6790.02,3800.37 ccw(c6767.09,3800.37) 6783.31,3816.59 ccw(c6799.52,3832.81) v1@6799.52,3809.87 ; v1@6794.02,3800.37 ccw(c6780.75,3800.37) 6790.14,3809.76 ccw(c6799.52,3819.15) v1@6799.52,3805.87 ; v1(6799.52,3800.37) 6766.52,3833.37 6440.19,3833.37 6381.86,3891.71 6337.52,3891.71 6323.52,3877.71 6259.52,3877.71 6256.86,3875.04 6190.19,3875.04 6160.7,3845.56 6140.44,3845.56 6091,3895 6055.31,3895 6014,3936.31 6014,3950 6014,4001 6006.34,4008.66 5920,4008.66 5910,4008.66 5782.64,4008.66 5763.22,4008.66 5689.1,4008.66 5669.6,4008.66 cw(c5669.6,4050.39) 5640.09,4020.88
  Bottom Layer w4: v1(6799.52,3800.37) 6867,3800.37 6875,3808.37 6940.19,3808.37 7073.52,3941.71 7082.19,3950.37 7082.19,4041.37 v1(7102.52,4061.71) ; v1@6803.41,3796.49 cw(c6812.8,3787.1) 6812.8,3800.37 cw(c6812.8,3813.65) v1@6803.41,3804.26 ; v1@6806.24,3793.66 cw(c6822.46,3777.44) 6822.46,3800.37 cw(c6822.46,3823.31) v1@6806.24,3807.09 ; v1@7093.02,4061.71 cw(c7070.09,4061.71) 7086.31,4045.49 cw(c7102.52,4029.27) v1@7102.52,4052.21 ; v1@7097.02,4061.71 cw(c7083.75,4061.71) 7093.14,4052.32 cw(c7102.52,4042.93) v1@7102.52,4056.21
DB_MEM.BUS_NBE1: U8.A22 U12.39 U16.40 | length 4144.3
  Top Layer w4: U8.A22@5719.34,4687.43 ccw(c5706.54,4700.23) 5724.65,4700.23 ccw(c5742.75,4700.23) U8.A22@5729.95,4687.43 ; U8.A22@5719.45,4687.32 ccw(c5706.92,4699.85) 5724.65,4699.85 ccw(c5742.37,4699.85) U8.A22@5729.84,4687.32 ; U8.A22@5724.65,4682.13 5724.65,4710 5724.65,4720 5724.65,4724.74 5724.65,4745.2 5796.18,4816.74 5796.18,4831.04 5802.32,4837.17 5823.52,4858.37 5823.52,4900.04 5873.52,4950.04 5873.52,5056.71 v1(5898.52,5081.71) ; v1@5889.02,5081.71 cw(c5866.09,5081.71) 5882.31,5065.49 cw(c5898.52,5049.27) v1@5898.52,5072.21 ; v1@5893.02,5081.71 cw(c5879.75,5081.71) 5889.14,5072.32 cw(c5898.52,5062.93) v1@5898.52,5076.21 ; v1(7173.19,4779.37) 7238.54,4844.72 U16.40@7294.41,4844.72 7326.86,4844.72 ; v1@7173.19,4784.87 ccw(c7173.19,4798.15) 7182.58,4788.76 ccw(c7191.97,4779.37) v1@7178.69,4779.37 ; v1@7173.19,4788.87 ccw(c7173.19,4811.81) 7189.41,4795.59 ccw(c7205.63,4779.37) v1@7182.69,4779.37 ; U16.40@7271.19,4839.07 ccw(c7257.54,4825.41) 7257.54,4844.72 ccw(c7257.54,4864.04) U16.40@7271.19,4850.38 ; U12.39@7294.41,3702.01 7323.97,3702.01 ; U16.40@7318.64,4840.31 cw(c7326.86,4834.87) 7326.86,4844.72 ; U16.40@7318.64,4849.14 ccw(c7326.86,4854.58) 7326.86,4844.72 ; U12.39@7319.35,3698.93 cw(c7323.97,3697.01) 7323.97,3702.01 ; U12.39@7319.35,3705.08 ccw(c7323.97,3707.01) 7323.97,3702.01 ; 7323.97,3702.01 7337.94,3715.98 7349.25,3715.98 7365.19,3700.04 7365.19,3665.04 7371.86,3658.37 7433.37,3658.37 7445,3670 7445,3726.16 7478.19,3759.35 7478.19,3857.37 7435,3900.56 7435,3994.85 7468.86,4028.71 7470.19,4030.04 7470.19,4778.37 7440.19,4808.37 7363.21,4808.37 7326.86,4844.72
  MidLayer1 w4: v1(5898.52,5081.71) 5933.52,5116.71 6515.19,5116.71 6548.52,5150.04 v1(6773.52,5150.04) ; v1@5898.52,5087.21 ccw(c5898.52,5100.49) 5907.91,5091.1 ccw(c5917.3,5081.71) v1@5904.02,5081.71 ; v1@5898.52,5091.21 ccw(c5898.52,5114.14) 5914.74,5097.93 ccw(c5930.96,5081.71) v1@5908.02,5081.71 ; v1@6766.81,5143.32 ccw(c6750.59,5127.11) 6750.59,5150.04 ccw(c6750.59,5172.98) v1@6766.81,5156.76 ; v1@6769.64,5146.15 ccw(c6760.25,5136.76) 6760.25,5150.04 ccw(c6760.25,5163.32) v1@6769.64,5153.93
  Bottom Layer w4: v1@6773.52,5140.54 cw(c6773.52,5117.61) 6789.74,5133.82 cw(c6805.96,5150.04) v1@6783.02,5150.04 ; v1@6773.52,5144.54 cw(c6773.52,5131.26) 6782.91,5140.65 cw(c6792.3,5150.04) v1@6779.02,5150.04 ; v1(6773.52,5150.04) 6798.52,5125.04 6859.19,5125.04 6884.19,5100.04 6930,5100.04 6942.52,5087.52 6942.52,5069.73 7083.47,4928.78 7083.47,4869.09 v1(7173.19,4779.37) ; v1@7163.69,4779.37 ccw(c7140.76,4779.37) 7156.97,4795.59 ccw(c7173.19,4811.81) v1@7173.19,4788.87 ; v1@7167.69,4779.37 ccw(c7154.41,4779.37) 7163.8,4788.76 ccw(c7173.19,4798.15) v1@7173.19,4784.87
DB_MEM.BUS_NBE2: U8.AA25 U13.15 U17.39 | length 2817.1
  Top Layer w4: 6054.12,3799.12 6076.52,3776.71 ; 6061.52,3791.71 6076.52,3776.71 ; 6128.22,3751.78 ccw(c6153.03,3776.6) U13.15@6153.03,3741.5 ; 6135.05,3744.95 ccw(c6153.03,3762.94) U13.15@6153.03,3737.5 ; 6141.87,3738.13 ccw(c6153.03,3749.28) U13.15@6153.03,3733.5 ; U13.15@6186.37,3741.3 cw(c6190.59,3722.8) 6204.01,3736.22 ; U13.15@6187.26,3737.4 cw(c6192.49,3714.47) v1@6209.13,3731.1 ; U13.15@6188.15,3733.5 cw(c6194.4,3706.14) v1@6214.24,3725.99 ; v1@6205.69,3725.04 ccw(c6182.76,3725.04) 6198.97,3741.26 ccw(c6215.19,3757.48) v1@6215.19,3734.54 ; v1@6209.69,3725.04 ccw(c6196.41,3725.04) 6205.8,3734.43 ccw(c6215.19,3743.82) v1@6215.19,3730.54 ; v1(6215.19,3725.04) 6198.52,3741.71 U13.15@6147.19,3741.71 ; v1@6460.47,3706.76 ccw(c6444.26,3722.98) 6467.19,3722.98 ccw(c6490.13,3722.98) v1@6473.91,3706.76 ; v1@6463.3,3703.93 ccw(c6453.91,3713.32) 6467.19,3713.32 ccw(c6480.47,3713.32) v1@6471.08,3703.93 ; v1(6467.19,3700.04) 6467.19,3798.04 6456.86,3808.37 6415.19,3808.37 6390.19,3833.37 6390.19,3958.37 6373.52,3975.04 6373.52,4041.67 6406.86,4075 6406.86,4100.04 6390.52,4116.37 6390.52,4331.65 6425.52,4366.65 6425.52,4416.73 6406.86,4435.39 6406.86,4544.69 6415.19,4553.02 6415.19,4735.19 6446.58,4766.58 6493.23,4813.23 U17.39@6619.41,4813.23 6495,4813.23 ; 5855.29,3882.19 ccw(c5862.47,3889.37) 5862.47,3879.22 ; 5855.29,3882.19 ccw(c5862.47,3889.37) 5862.47,3879.22 ; 5855.29,3882.19 cw(c5867.83,3894.72) 5850.1,3894.72 ccw(c5867.83,3894.72) 5855.29,3882.19 ; 5855.29,3882.19 ccw(c5842.76,3869.66) 5842.76,3887.38 cw(c5842.76,3869.66) 5855.29,3882.19 ; 5862.47,3879.22 5910,3879.22 5920,3879.22 5974.01,3879.22 6076.52,3776.71 ; 6076.52,3776.71 6078.19,3775.04 ; 6076.52,3776.71 6078.19,3775.04 ; 6078.19,3775.04 6090,3775 6105,3775 6146.5,3733.5 U13.15@6155.4,3733.5 ; U13.15@6147.19,3741.71 U13.15@6155.4,3733.5 ; U13.15@6147.19,3741.71 U13.15@6155.4,3733.5 ; U13.15@6155.4,3733.5 U13.15@6170.59,3733.5 U13.15@6155.4,3733.5 ; 6582.54,4813.23 cw(c6582.54,4793.91) 6596.19,4807.57 ccw(c6582.54,4793.91) 6582.54,4813.23 ; 6582.54,4813.23 ccw(c6582.54,4832.54) 6596.19,4818.88 cw(c6582.54,4832.54) 6582.54,4813.23
  Bottom Layer w4: v1(6215.19,3725.04) 6240.19,3750.04 6310,3750.04 6310.5,3750.54 6348.02,3750.54 6365.19,3733.37 6433.86,3733.37 v1(6467.19,3700.04) ; v1@6215.19,3730.54 ccw(c6215.19,3743.82) 6224.58,3734.43 ccw(c6233.97,3725.04) v1@6220.69,3725.04 ; v1@6215.19,3734.54 ccw(c6215.19,3757.48) 6231.41,3741.26 ccw(c6247.63,3725.04) v1@6224.69,3725.04 ; v1@6457.69,3700.04 ccw(c6434.76,3700.04) 6450.97,3716.26 ccw(c6467.19,3732.48) v1@6467.19,3709.54 ; v1@6461.69,3700.04 ccw(c6448.41,3700.04) 6457.8,3709.43 ccw(c6467.19,3718.82) v1@6467.19,3705.54
DB_MEM.BUS_NBE3: U8.V25 U13.39 U17.40 | length 2854.6
  Top Layer w4: U8.V25@5842.76,4005.49 cw(c5842.76,3987.77) 5855.29,4000.3 ; U8.V25@5850.1,4012.83 ccw(c5867.83,4012.83) 5855.29,4000.3 ; 6056.33,3992.23 ccw(c6075,4010.9) v1@6075,3984.5 ; 6059.8,3988.77 cw(c6046.03,3975) v1@6065.5,3975 ; 6063.16,3985.4 ccw(c6075,3997.24) v1@6075,3980.5 ; v1(6075,3975) 6073.56,3975 6047.03,4001.54 6034,4001.54 6021.51,4001.54 6017.31,3997.33 5970.79,3997.33 5960,3997.33 5924.74,3997.33 5920,3997.33 5910,3997.33 5862.47,3997.33 cw(c5862.47,4007.48) 5855.29,4000.3 ; U13.39@6619.41,3702.01 6646.97,3702.01 6661.67,3716.71 ; U17.40@6619.41,4844.72 6670.51,4844.72 6765.19,4750.04 6765.19,4720.37 6790.19,4695.37 6790.19,4653.37 6806.86,4636.71 6806.86,4475.04 6781.86,4450.04 6781.86,4383.37 6773.52,4375.04 6773.52,4325.04 6738.86,4290.37 6738.86,4257.04 6706.86,4225.04 6706.86,4200.04 6731.86,4175.04 6731.86,4115.37 6715.19,4098.71 v1(6715.19,3938.71) 6715.19,3852.37 6725.86,3841.71 6754.19,3841.71 6765.19,3830.71 6765.19,3711.04 6754.19,3700.04 6724.86,3700.04 6708.19,3716.71 6661.67,3716.71 ; U13.39@6636.97,3702.01 ccw(c6640.17,3717.29) 6651.21,3706.25 ; U13.39@6637.79,3705.92 ccw(c6641.98,3725.94) 6656.44,3711.48 ; U13.39@6638.61,3709.84 ccw(c6643.79,3734.59) 6661.67,3716.71 ; U17.40@6642.63,4839.07 cw(c6656.28,4825.41) 6656.28,4844.72 cw(c6656.28,4864.04) U17.40@6642.63,4850.38 ; v1@6708.47,3931.99 cw(c6692.26,3915.77) 6715.19,3915.77 cw(c6738.13,3915.77) v1@6721.91,3931.99 ; v1@6708.47,3945.43 ccw(c6692.26,3961.64) 6715.19,3961.64 ccw(c6738.13,3961.64) v1@6721.91,3945.43 ; v1@6711.3,3934.82 cw(c6701.91,3925.43) 6715.19,3925.43 cw(c6728.47,3925.43) v1@6719.08,3934.82 ; v1@6711.3,3942.6 ccw(c6701.91,3951.99) 6715.19,3951.99 ccw(c6728.47,3951.99) v1@6719.08,3942.6
  MidLayer2 w4: v1(6075,3975) 6100,4000 6141.9,4000 6155.53,3986.37 ; v1@6075,3980.5 ccw(c6075,3993.78) 6084.39,3984.39 ccw(c6093.78,3975) v1@6080.5,3975 ; v1@6075,3984.5 ccw(c6075,4007.43) 6091.22,3991.22 ccw(c6107.43,3975) v1@6084.5,3975 ; 6141.9,4000 6155.53,3986.37 ; v1@6705.69,3938.71 ccw(c6682.76,3938.71) 6698.97,3954.93 ccw(c6715.19,3971.14) v1@6715.19,3948.21 ; v1@6709.69,3938.71 ccw(c6696.41,3938.71) 6705.8,3948.1 ccw(c6715.19,3957.49) v1@6715.19,3944.21 ; v1(6715.19,3938.71) 6687.19,3966.71 6384.84,3966.71 6357.17,3994.37 6265.19,3994.37 6229.19,3958.37 6183.52,3958.37 6155.53,3986.37
DB_MEM.BUS_NOE: U7.G2 U8.AD11 U16.41 U17.41 U61.107 | length 9153
  Top Layer w4: 5267.71,3651.25 5267.71,3654.46 ; U8.AD11@5284.23,3776.61 cw(c5266.51,3776.61) 5279.04,3764.08 ; U8.AD11@5291.57,3769.27 ccw(c5291.57,3751.55) 5279.04,3764.08 ; 5338.93,3316.45 cw(c5356.86,3298.53) v1@5356.86,3323.87 ; 5341.35,3318.86 ccw(c5326.84,3333.37) v1@5347.36,3333.37 ; 5345.76,3323.28 cw(c5356.86,3312.18) v1@5356.86,3327.87 ; 5348.18,3325.69 ccw(c5340.49,3333.37) v1@5351.36,3333.37 ; v1(5356.86,3333.37) 5355.86,3333.37 5322,3299.52 5322,3256.85 5298.52,3233.37 5265.19,3233.37 5232.19,3266.37 5232.19,3422.19 5238.02,3428.02 5238.02,3552.62 5267.71,3582.31 5267.71,3654.46 ; v1(5398.52,2678.71) 5425.18,2705.36 U61.107@5516.83,2705.36 ; v1@5398.52,2684.21 ccw(c5398.52,2697.49) 5407.91,2688.1 ccw(c5417.3,2678.71) v1@5404.02,2678.71 ; v1@5398.52,2688.21 ccw(c5398.52,2711.14) 5414.74,2694.93 ccw(c5430.96,2678.71) v1@5408.02,2678.71 ; U61.107@5500.81,2702.53 ccw(c5493.98,2695.7) 5493.98,2705.36 ccw(c5493.98,2715.02) U61.107@5500.81,2708.19 ; U17.41@6629.04,4876.22 cw(c6629.04,4830.7) v1@6661.29,4862.83 ; U17.41@6638.67,4876.22 cw(c6638.67,4840.29) v1@6664.13,4865.65 ; U17.41@6642.75,4870.69 cw(c6655.68,4858.34) 6655.68,4876.22 ; U17.41@6642.75,4881.75 ccw(c6655.68,4894.1) 6655.68,4876.22 ; 6648.31,4876.22 cw(c6648.31,4849.89) v1@6666.96,4868.47 ; v1@6658.46,4860 ccw(c6619.41,4821.1) U17.41@6619.41,4876.22 6655.68,4876.22 ; v1(6665.19,4866.71) 6655.68,4876.22 ; v1(7185.52,4833.37) 7228.37,4876.22 U16.41@7294.41,4876.22 7346.86,4876.22 7356.86,4866.22 v1(7356.86,4840.71) ; v1@7185.52,4838.87 ccw(c7185.52,4852.15) 7194.91,4842.76 ccw(c7204.3,4833.37) v1@7191.02,4833.37 ; v1@7185.52,4842.87 ccw(c7185.52,4865.81) 7201.74,4849.59 ccw(c7217.96,4833.37) v1@7195.02,4833.37 ; U16.41@7271.19,4870.56 ccw(c7257.54,4856.91) 7257.54,4876.22 ccw(c7257.54,4895.53) U16.41@7271.19,4881.88 ; U16.41@7317.63,4870.56 cw(c7331.28,4856.91) 7331.28,4876.22 cw(c7331.28,4895.53) U16.41@7317.63,4881.88 ; v1@7350.14,4847.43 ccw(c7333.92,4863.64) 7356.86,4863.64 ccw(c7379.79,4863.64) v1@7363.57,4847.43 ; v1@7352.97,4844.6 ccw(c7343.58,4853.99) 7356.86,4853.99 ccw(c7370.14,4853.99) v1@7360.75,4844.6 ; v1@7541.81,3626.66 cw(c7525.59,3610.44) 7548.52,3610.44 cw(c7571.46,3610.44) v1@7555.24,3626.66 ; v1@7544.64,3629.49 cw(c7535.25,3620.1) 7548.52,3620.1 cw(c7561.8,3620.1) v1@7552.41,3629.49 ; v1(7548.52,3633.37) 7548.52,3523.04 7631.86,3439.71 7631.86,3270.37 7690.19,3212.04 7690.19,2984.71 v1(7655.52,2950.04) ; v1@7655.52,2955.54 ccw(c7655.52,2968.82) 7664.91,2959.43 ccw(c7674.3,2950.04) v1@7661.02,2950.04 ; v1@7655.52,2959.54 ccw(c7655.52,2982.48) 7671.74,2966.26 ccw(c7687.96,2950.04) v1@7665.02,2950.04 ; 5267.71,3654.46 5267.71,3655.26 5267.71,3659.75 ; 5267.71,3654.46 5267.71,3659.75 ; 5267.71,3659.75 5267.71,3660 5267.71,3670 5267.71,3736.73 cw(c5306.39,3736.73) 5279.04,3764.08
  Top Layer w8: v2@7731.89,4594.11 cw(c7731.89,4572.38) 7747.25,4587.75 cw(c7762.62,4603.11) v2@7740.89,4603.11 ; v2(7731.89,4603.11) U7.G2@7751.58,4583.43 ; U7.G2@7745.58,4583.43 ccw(c7731.09,4583.43) 7741.33,4593.67 ccw(c7751.58,4603.91) U7.G2@7751.58,4589.43
  MidLayer1 w4: v1@5356.86,3323.87 cw(c5356.86,3300.94) 5373.07,3317.16 cw(c5389.29,3333.37) v1@5366.36,3333.37 ; v1@5356.86,3327.87 cw(c5356.86,3314.6) 5366.25,3323.99 cw(c5375.64,3333.37) v1@5362.36,3333.37 ; v1(5356.86,3333.37) 5440.19,3250.04 5440.19,3190 5431.86,3181.67 5431.86,3160 5431.86,2970.21 5428.15,2966.5 5427.81,2966.5 5403.5,2942.19 5403.5,2941.85 5381.52,2919.87 5381.52,2695.71 v1(5398.52,2678.71) ; v1@5389.02,2678.71 ccw(c5366.09,2678.71) 5382.31,2694.93 ccw(c5398.52,2711.14) v1@5398.52,2688.21 ; v1@5393.02,2678.71 ccw(c5379.75,2678.71) 5389.14,2688.1 ccw(c5398.52,2697.49) v1@5398.52,2684.21 ; v1@7539.02,3633.37 ccw(c7516.09,3633.37) 7532.31,3649.59 ccw(c7548.52,3665.81) v1@7548.52,3642.87 ; v1@7543.02,3633.37 ccw(c7529.75,3633.37) 7539.14,3642.76 ccw(c7548.52,3652.15) v1@7548.52,3638.87 ; v1(7548.52,3633.37) 7523.52,3658.37 7523.52,3745 7506.86,3761.67 7506.86,3916.71 7506.86,4456.86 7631.86,4581.86 7631.86,4606.71 7648.52,4623.37 7711.63,4623.37 v2(7731.89,4603.11) ; v2@7720.89,4603.11 ccw(c7694.33,4603.11) 7713.11,4621.89 ccw(c7731.89,4640.67) v2@7731.89,4614.11 ; v2@7724.89,4603.11 ccw(c7707.99,4603.11) 7719.94,4615.06 ccw(c7731.89,4627.01) v2@7731.89,4610.11
  MidLayer2 w4: v1@6655.69,4866.71 cw(c6632.76,4866.71) 6648.97,4850.49 cw(c6665.19,4834.27) v1@6665.19,4857.21 ; v1@6659.69,4866.71 cw(c6646.41,4866.71) 6655.8,4857.32 cw(c6665.19,4847.93) v1@6665.19,4861.21 ; v1(6665.19,4866.71) 6640.19,4841.71 6640.19,4809.37 6674.52,4775.04 6691.19,4775.04 6724.52,4808.37 6786.52,4808.37 6811.52,4783.37 7135.52,4783.37 v1(7185.52,4833.37) ; v1@7176.02,4833.37 cw(c7153.09,4833.37) 7169.31,4817.16 cw(c7185.52,4800.94) v1@7185.52,4823.87 ; v1@7180.02,4833.37 cw(c7166.75,4833.37) 7176.14,4823.99 cw(c7185.52,4814.6) v1@7185.52,4827.87
  Bottom Layer w4: v1(5398.52,2678.71) 5411.52,2691.71 5556.86,2691.71 5573.52,2708.37 5573.52,2725.04 5581.86,2733.37 5721.86,2733.37 5723.52,2731.71 5723.52,2691.71 5714.19,2682.37 5714.19,2642.37 5723.19,2633.37 5758.52,2633.37 5814.19,2577.71 6382.17,2577.71 6392.17,2567.71 6469.17,2567.71 6509.84,2608.37 6688.52,2608.37 6698.52,2618.37 6960.25,2618.37 6966.92,2625.04 7115.19,2625.04 7381.86,2891.71 7506.86,2891.71 7565.19,2950.04 v1(7655.52,2950.04) ; v1@7350.14,4847.43 ccw(c7333.92,4863.64) 7356.86,4863.64 ccw(c7379.79,4863.64) v1@7363.57,4847.43 ; v1@7352.97,4844.6 ccw(c7343.58,4853.99) 7356.86,4853.99 ccw(c7370.14,4853.99) v1@7360.75,4844.6 ; v1(7356.86,4840.71) 7356.86,4881.86 7373.34,4898.34 7373.34,4918.34 7520,5065 7616.9,5065 7673.19,5008.71 7673.19,4631.37 7682.19,4622.37 7712.63,4622.37 v2(7731.89,4603.11) ; v1@7648.81,2943.32 ccw(c7632.59,2927.11) 7632.59,2950.04 ccw(c7632.59,2972.98) v1@7648.81,2956.76 ; v1@7651.64,2946.15 ccw(c7642.25,2936.76) 7642.25,2950.04 ccw(c7642.25,2963.32) v1@7651.64,2953.93 ; v2@7720.89,4603.11 ccw(c7694.33,4603.11) 7713.11,4621.89 ccw(c7731.89,4640.67) v2@7731.89,4614.11 ; v2@7724.89,4603.11 ccw(c7707.99,4603.11) 7719.94,4615.06 ccw(c7731.89,4627.01) v2@7731.89,4610.11
DB_MEM.BUS_NWE: U7.A5 U8.M3 U12.16 U13.16 U16.17 U17.17 U61.108 | length 13659.1
  Top Layer w4: v1@4684.86,4354.21 cw(c4684.86,4331.27) 4701.07,4347.49 cw(c4717.29,4363.71) v1@4694.36,4363.71 ; v1@4684.86,4358.21 cw(c4684.86,4344.93) 4694.25,4354.32 cw(c4703.64,4363.71) v1@4690.36,4363.71 ; v1(4684.86,4363.71) 4774.02,4274.54 4820,4274.54 4821.62,4272.92 4855.26,4272.92 ; 4848.52,4272.92 4851.26,4272.92 4855.26,4272.92 ; U8.M3@4969.27,4249.06 ccw(c4951.55,4249.06) 4964.08,4261.59 ; U8.M3@4976.61,4256.4 cw(c4976.61,4274.12) 4964.08,4261.59 ; U61.108@5516.83,2685.68 5548.19,2685.68 5583.83,2650.04 5609.52,2650.04 5623.52,2636.04 5623.52,2476.04 5699.52,2400.04 6140.19,2400.04 6223.52,2316.71 6286.19,2316.71 6323.52,2279.37 6494.52,2279.37 6531.86,2316.71 6531.86,2458.37 6548.52,2475.04 6571.52,2475.04 6581.86,2485.37 6581.86,2641.86 6606.71,2666.71 6874.52,2666.71 v1(6924.52,2716.71) ; U61.108@5532.85,2682.85 cw(c5539.68,2676.02) 5539.68,2685.68 cw(c5539.68,2695.33) U61.108@5532.85,2688.5 ; v1@6127.52,4480.54 cw(c6127.52,4457.61) 6143.74,4473.82 cw(c6159.96,4490.04) v1@6137.02,4490.04 ; v1@6127.52,4484.54 cw(c6127.52,4471.26) 6136.91,4480.65 cw(c6146.3,4490.04) v1@6133.02,4490.04 ; v1(6127.52,4490.04) 6150.79,4466.77 U17.17@6170.59,4466.77 U17.17@6173.52,4466.77 ; v1@6135.55,4482.01 ccw(c6153.03,4499.49) U17.17@6153.03,4474.77 ; 6140.96,4476.61 cw(c6131.12,4466.77) U17.17@6145.03,4466.77 ; 6142.38,4475.18 ccw(c6153.03,4485.83) U17.17@6153.03,4470.77 ; U13.16@6170.59,3702.01 6204.89,3702.01 ; U13.16@6194.37,3696.98 cw(c6204.89,3688.49) 6204.89,3702.01 ; U13.16@6194.37,3707.03 ccw(c6204.89,3715.52) 6204.89,3702.01 ; v1@6330.69,3733.04 cw(c6307.76,3733.04) 6323.97,3716.82 cw(c6340.19,3700.61) v1@6340.19,3723.54 ; v1@6334.69,3733.04 cw(c6321.41,3733.04) 6330.8,3723.65 cw(c6340.19,3714.26) v1@6340.19,3727.54 ; v1(6340.19,3733.04) 6298.86,3691.71 6215.19,3691.71 6204.89,3702.01 ; U12.16@6845.59,3702.01 6892.99,3702.01 6898.52,3696.48 v1(6898.52,3666.71) ; U16.17@6845.59,4466.77 6875.59,4466.77 ; U12.16@6868.81,3696.35 cw(c6882.46,3682.69) 6882.46,3702.01 cw(c6882.46,3721.32) U12.16@6868.81,3707.66 ; U16.17@6870.43,4463.45 cw(c6875.59,4461.1) 6875.59,4466.77 ; U16.17@6870.43,4470.09 ccw(c6875.59,4472.44) 6875.59,4466.77 ; v1@6890.18,4469.16 ccw(c6882.52,4464.98) 6882.52,4473.71 ; v1@6890.18,4478.26 cw(c6882.52,4482.43) 6882.52,4473.71 ; v1@6891.81,3673.43 ccw(c6875.59,3689.64) 6898.52,3689.64 ccw(c6921.46,3689.64) v1@6905.24,3673.43 ; v1@6894.64,3670.6 ccw(c6885.25,3679.99) 6898.52,3679.99 ccw(c6911.8,3679.99) v1@6902.41,3670.6 ; v1(6898.52,4473.71) 6882.52,4473.71 ; v1@6915.02,2716.71 cw(c6892.09,2716.71) 6908.31,2700.49 cw(c6924.52,2684.27) v1@6924.52,2707.21 ; v1@6919.02,2716.71 cw(c6905.75,2716.71) 6915.14,2707.32 cw(c6924.52,2697.93) v1@6924.52,2711.21 ; 4855.26,4272.92 4860,4272.92 4870,4272.92 4936.73,4272.92 cw(c4936.73,4234.24) 4964.08,4261.59 ; 6875.59,4466.77 6882.52,4473.71
  Top Layer w8: U7.A5@7987.8,4459.32 cw(c7987.8,4444.83) 7998.04,4455.07 cw(c8008.28,4465.32) U7.A5@7993.8,4465.32 ; U7.A5@7987.8,4465.32 v2(8007.48,4445.63) ; v2@7998.48,4445.63 ccw(c7976.75,4445.63) 7992.12,4460.99 ccw(c8007.48,4476.36) v2@8007.48,4454.63
  MidLayer1 w4: v1(6127.52,4490.04) 6162.52,4525.04 6265.19,4525.04 6306.86,4566.71 6373.52,4566.71 6389.19,4551.04 6568.96,4551.04 6577.96,4542.04 6830.19,4542.04 v1(6898.52,4473.71) 6966.52,4541.71 6990.19,4541.71 7006.86,4558.37 7006.86,4633.37 6948.52,4691.71 6865.19,4691.71 6856.86,4683.37 6773.52,4683.37 6756.86,4700.04 v1(6681.86,4700.04) ; v1@6127.52,4495.54 ccw(c6127.52,4508.82) 6136.91,4499.43 ccw(c6146.3,4490.04) v1@6133.02,4490.04 ; v1@6127.52,4499.54 ccw(c6127.52,4522.48) 6143.74,4506.26 ccw(c6159.96,4490.04) v1@6137.02,4490.04 ; v1@6685.75,4696.15 cw(c6695.14,4686.76) 6695.14,4700.04 cw(c6695.14,4713.32) v1@6685.75,4703.93 ; v1@6688.57,4693.32 cw(c6704.79,4677.11) 6704.79,4700.04 cw(c6704.79,4722.98) v1@6688.57,4706.76 ; v1@6889.02,4473.71 ccw(c6866.09,4473.71) 6882.31,4489.93 ccw(c6898.52,4506.14) 6898.52,4483.21 ccw(c6898.52,4506.14) 6914.74,4489.93 ccw(c6930.96,4473.71) v1@6908.02,4473.71 ; v1@6893.02,4473.71 ccw(c6879.75,4473.71) 6889.14,4483.1 ccw(c6898.52,4492.49) 6898.52,4479.21 ccw(c6898.52,4492.49) 6907.91,4483.1 ccw(c6917.3,4473.71) v1@6904.02,4473.71 ; v1(6898.52,3666.71) 6981.86,3750.04 6981.86,3872.06 7065,3955.2 ; v1@6898.52,3672.21 ccw(c6898.52,3685.49) 6907.91,3676.1 ccw(c6917.3,3666.71) v1@6904.02,3666.71 ; v1@6898.52,3676.21 ccw(c6898.52,3699.14) 6914.74,3682.93 ccw(c6930.96,3666.71) v1@6908.02,3666.71 ; v1@6941.81,4740.09 ccw(c6925.59,4756.31) 6948.52,4756.31 ccw(c6971.46,4756.31) v1@6955.24,4740.09 ; v1@6944.64,4737.26 ccw(c6935.25,4746.65) 6948.52,4746.65 ccw(c6961.8,4746.65) v1@6952.41,4737.26 ; v1(6948.52,4733.37) 6948.52,4783.37 6965.19,4800.04 7189.52,4800.04 7198.52,4791.04 7198.52,4633.37 7115.19,4550.04 7115.19,4475.04 7140.19,4450.04 7140.19,4314.37 7131.86,4306.04 7131.86,4191.71 7065.52,4125.37 7065.52,3955.73
  MidLayer2 w4: v1(4684.86,4363.71) 4669.19,4379.37 4669.19,4580.37 4656.19,4593.37 4656.19,4721.39 4756.86,4822.06 4756.86,5058.37 4856.86,5158.37 5115.19,5158.37 5177.56,5096 5322.15,5096 ; 5330.01,5103.86 5322.15,5096 ; v1@6340.19,3723.54 cw(c6340.19,3700.61) 6356.41,3716.82 cw(c6372.63,3733.04) v1@6349.69,3733.04 ; v1@6340.19,3727.54 cw(c6340.19,3714.26) 6349.58,3723.65 cw(c6358.97,3733.04) v1@6345.69,3733.04 ; v1(6340.19,3733.04) 6356.52,3716.71 6406.86,3716.71 6451.19,3672.37 6729.19,3672.37 6781.86,3725.04 6840.19,3725.04 v1(6898.52,3666.71) 7015.19,3550.04 7015.19,3166.71 6942.19,3093.71 6942.19,3023.04 6973.52,2991.71 6973.52,2765.71 v1(6924.52,2716.71) ; v1@6672.36,4700.04 ccw(c6649.42,4700.04) 6665.64,4716.26 ccw(c6681.86,4732.48) v1@6681.86,4709.54 ; v1@6676.36,4700.04 ccw(c6663.08,4700.04) 6672.47,4709.43 ccw(c6681.86,4718.82) v1@6681.86,4705.54 ; v1(6681.86,4700.04) 6630.02,4751.87 6630.02,5151.74 6581.73,5200.04 5672.21,5200.04 5642.88,5229.37 5455.52,5229.37 5322.15,5096 ; v1@6889.02,3666.71 ccw(c6866.09,3666.71) 6882.31,3682.93 ccw(c6898.52,3699.14) v1@6898.52,3676.21 ; v1@6893.02,3666.71 ccw(c6879.75,3666.71) 6889.14,3676.1 ccw(c6898.52,3685.49) v1@6898.52,3672.21 ; v1@6898.52,3657.21 cw(c6898.52,3634.27) 6914.74,3650.49 cw(c6930.96,3666.71) v1@6908.02,3666.71 ; v1@6898.52,3661.21 cw(c6898.52,3647.93) 6907.91,3657.32 cw(c6917.3,3666.71) v1@6904.02,3666.71 ; v1(6898.52,4473.71) 6913.86,4458.37 6964.19,4458.37 6973.52,4467.71 6973.52,4500 6973.52,4508.37 6973.52,4522.06 6984.84,4533.37 6998.52,4533.37 7020,4533.37 7153.19,4533.37 7211.52,4475.04 7269.19,4475.04 7278.19,4484.04 7969.07,4484.04 ; v1@6924.52,2722.21 ccw(c6924.52,2735.49) 6933.91,2726.1 ccw(c6943.3,2716.71) v1@6930.02,2716.71 ; v1@6924.52,2726.21 ccw(c6924.52,2749.14) 6940.74,2732.93 ccw(c6956.96,2716.71) v1@6934.02,2716.71 ; v2@7996.48,4445.63 ccw(c7969.92,4445.63) 7988.7,4464.41 ccw(c8007.48,4483.19) v2@8007.48,4456.63 ; v2@8000.48,4445.63 ccw(c7983.58,4445.63) 7995.53,4457.58 ccw(c8007.48,4469.53) v2@8007.48,4452.63 ; 7969.07,4484.04 7969.74,4483.37 ; 7969.07,4484.04 7977.05,4476.06 ; 7969.07,4484.04 7973.92,4479.19 ; 7969.74,4483.37 v2(8007.48,4445.63) ; 7969.74,4483.37 7973.92,4479.19 ; 7973.92,4479.19 7996.56,4456.55 ; 7973.92,4479.19 7977.05,4476.06 ; 7977.05,4476.06 7977.76,4475.35 7980.19,4472.92 7996.56,4456.55 ; 7996.56,4456.55 v2(8007.48,4445.63) ; 7996.56,4456.55 v2(8007.48,4445.63)
  Bottom Layer w4: v1(6898.52,4473.71) 6948.52,4523.71 v1(6948.52,4733.37) ; v1@6898.52,4479.21 ccw(c6898.52,4492.49) 6907.91,4483.1 ccw(c6917.3,4473.71) v1@6904.02,4473.71 ; v1@6898.52,4483.21 ccw(c6898.52,4506.14) 6914.74,4489.93 ccw(c6930.96,4473.71) v1@6908.02,4473.71 ; v1@6941.81,4726.66 cw(c6925.59,4710.44) 6948.52,4710.44 cw(c6971.46,4710.44) v1@6955.24,4726.66 ; v1@6944.64,4729.49 cw(c6935.25,4720.1) 6948.52,4720.1 cw(c6961.8,4720.1) v1@6952.41,4729.49